# Altium PCB PCB1.PcbDoc
Units mm, origin at the board's own origin, x right, y up, seen from the top; angles counter-clockwise.
Board outline 24 x 24.06 mm, 2 copper layers (Top Layer, Bottom Layer); 36 components, 33 nets, 153 pads, 41 vias.
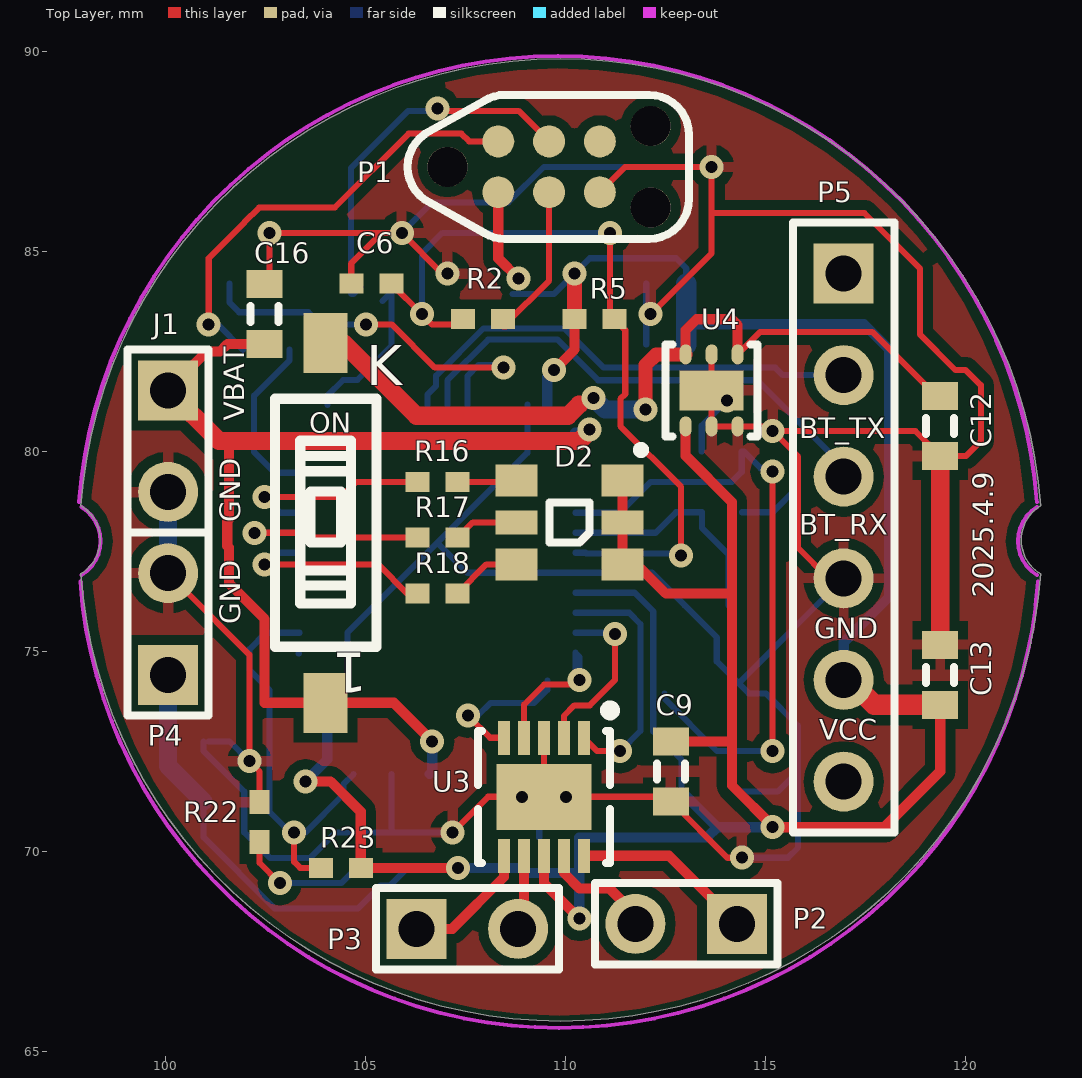
[diagram p0: Top Layer view]
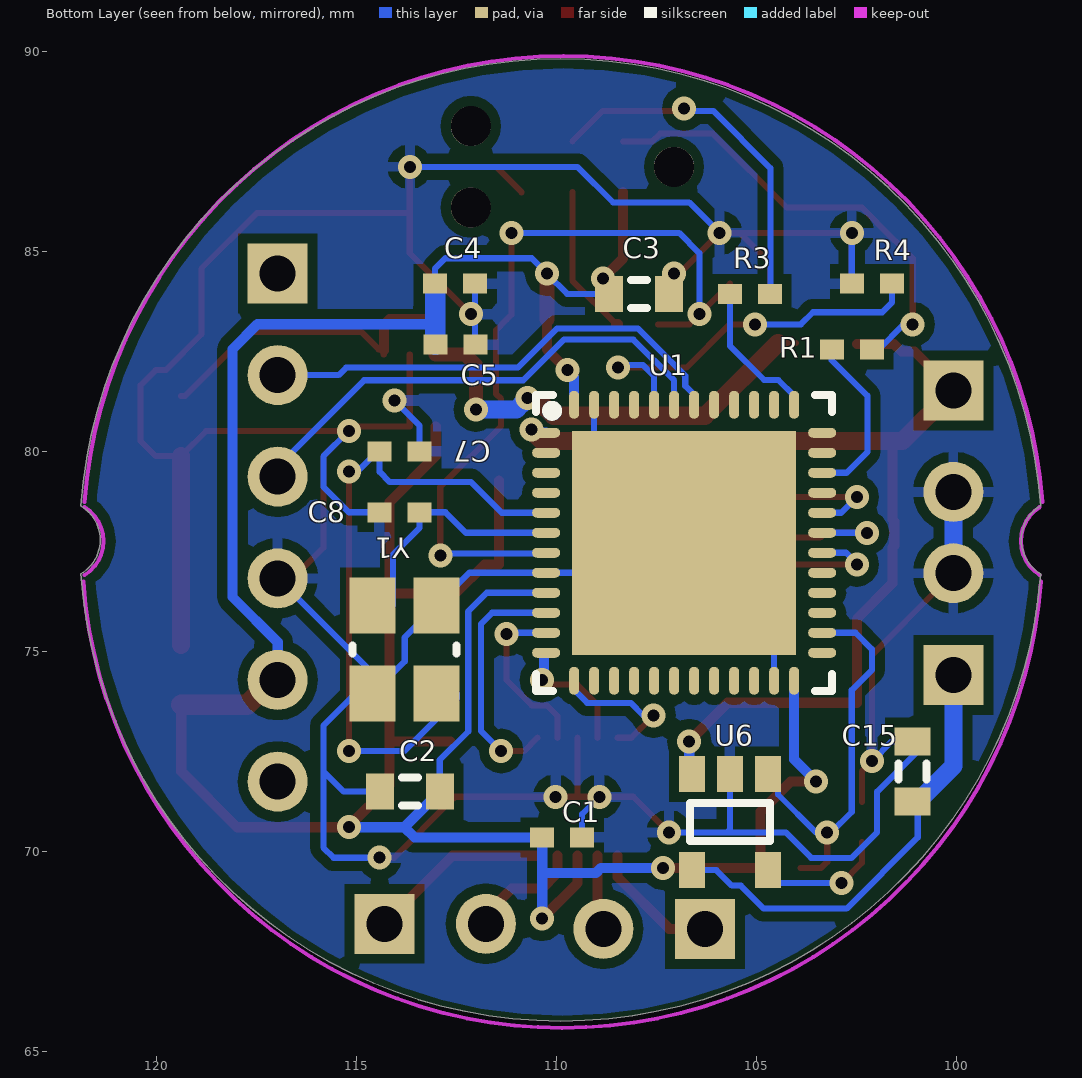
[diagram p1: Bottom Layer view, seen from below]

## Layer stack, top to bottom
Top Solder: solder mask 0.0102, Solder Resist, Dk 3.5
Top Layer: signal copper 0.0356
Dielectric 1: dielectric 0.32, FR-4, Dk 4.8
Bottom Layer: signal copper 0.0356
Bottom Solder: solder mask 0.0102, Solder Resist, Dk 3.5

## Board outline
97.893,76.946 ccw(c97.392,77.796) 97.894,78.646 cw(c109.892,77.796) 121.89,78.648 121.891,78.646 ccw(c122.392,77.796) 121.89,76.946 cw(c109.892,77.796)

## Design rules (kind name [scope] priority, off if disabled: settings)
Clearance [All] p1: gap=0.254 except(0.127: Arc-Arc Track-SMDPad Arc-Track Arc-SMDPad Track-Track SMDPad-SMDPad)
PolygonConnect [All] p1: connectstyle=Relief reliefconductorwidth=0.254 reliefentries=4 polygonreliefangle="90 Angle" airgapwidth=0.254
RoutingVias [All] p1: holewidth=0.711 width=1.27 viastyle="Through Hole" minholewidth=0.711 minwidth=1.27 maxholewidth=0.711 maxwidth=1.27
SolderMaskExpansion [All] p1: expansion=0.102
UnpouredPolygon [All] p1: allowunpoured=FALSE
Width [All] p1: maxlimit=0.254 minlimit=0.127 preferedwidth=0.152 minimp=50.000000 maximp=50.000000 favimp=50.000000
29 further rules are at their usual default settings.

## Classes and differential pairs
net class MOTOR_CONTROL[1..4]: MOTOR_CONTROL1 MOTOR_CONTROL2 MOTOR_CONTROL3 MOTOR_CONTROL4
net class RGBLED[1..3]: RGBLED1 RGBLED2 RGBLED3

## Components (designator, comment, footprint, x,y, rotation, side; value= is the part's Value field where it differs from the comment)
C1 "10nF" 0402 109.855,70.358 r0 bottom
C2 "1uF" 0603 113.665,71.502 r180 bottom
C3 "4.7uF" 0603 107.938,83.947 r0 bottom
C4 "100nF" 0402 112.53,84.201 r0 bottom
C5 "100nF" 0402 112.522,82.677 r0 bottom
C6 "100nF" 0402 105.156,84.201 r0 top
C7 "22pF" 0402 113.919,80.01 r0 bottom
C8 "22pF" 0402 113.927,78.486 r180 bottom
C9 "10uF" 0603 112.649,72.009 r90 top
C12 "1uF" 0603 119.38,80.645 r90 top
C13 "1uF" 0603 119.38,74.422 r270 top
C15 "4.7uF" 0603 101.092,72.009 r270 bottom
C16 "4.7uF" 0603 102.489,83.439 r270 top
D2 "SMLVN6RGB1W1" "3.5x2.8 mm 6-SMD" 110.109,78.232 r180 top
J1 "78171-0002" HDR1*2 100.076,80.264 r0 top
K "2.54-1P-PGT" SW-SMD_2P-L6.2-LS9.4 104.013,78.359 r90 top
P1 "TC2030-IDC-NL" TC2030-IDC-NL 109.601,87.122 r0 top
P2 "HEADER 2X1 0.05\" UNPOLARIZED" HDR1*2 113.03,68.199 r270 top
P3 "HEADER 2X1 0.05\" UNPOLARIZED" HDR1*2 107.557,68.072 r90 top
P4 "CHARGING PAD" HDR1*2 100.076,75.692 r180 top
P5 "Header 6" HDR1X6 116.967,84.455 r270 top
R1 "22R" 0402 102.616,82.55 r180 bottom
R2 "22R" 0402 107.95,83.312 r0 top
R3 "22R" 0402 105.164,83.947 r180 bottom
R4 "100K" 0402 102.108,84.201 r180 bottom
R5 "100K" 0402 110.736,83.312 r180 top
R16 "22.6R" 0402 106.807,79.248 r0 top
R17 "130R" 0402 106.807,77.851 r0 top
R18 "24.9R" 0402 106.807,76.454 r0 top
R22 "10K" 0402 102.362,70.739 r90 top
R23 "100K" 0402 104.394,69.596 r0 top
U1 "STM32F051C8U6" QFN50P700X700X60_HS-49L 106.807,77.724 r180 bottom
U3 "A3901SEJTR-T" DFN50P300X300X75_HS-11N 109.474,71.374 r180 top
U4 "ADP122ACPZ-3.3-R7" "LFCSP-6 2.0X2.0X0.55" 113.665,81.534 r0 top
U6 "MCP73831T-2ACI/OT" SOT-23-OT5_L 105.664,70.739 r270 bottom
Y1 "7V-16.000MAAE-T" "3.2x2.5 CRYSTAL" 113.792,75.057 r90 bottom

## Footprints (in the part's own frame and the unit in brackets; to place one, negate y for a bottom-side part, rotate by r counter-clockwise, add the part's x,y. Pads: shape width x height; smd on the part's side, far side on the other; paste and mask are expansions set on the pad)
"3.2x2.5 CRYSTAL" [mm]
  rect 1.4x1.15 smd: 1(-1.1,-0.8) 2(1.1,-0.8) 3(1.1,0.8) 4(-1.1,0.8)
  silkscreen extent -0.1,-1.3 0.1,1.3, body extent -1.6,-1.25 1.6,1.25, height 0.8
"3.5x2.8 mm 6-SMD" [mm] "3.5 x 2.8 mm 6-SMD Flat Leads"
  rect 1.05x0.8 smd: 1(-1.325,1.05) 3(-1.325,-1.05) 4(1.325,-1.05) 6(1.325,1.05)
  rect 1.05x0.6 smd: 2(-1.325,0) 5(1.325,0)
  silkscreen extent -0.5,-0.5 0.5,0.5, body extent -1.75,-1.4 1.75,1.4, height 0.6
0402 [mm] "Chip Body 1.0 x 0.5 mm (LxW typ)"
  rect 0.6x0.5 smd: 1(-0.5,0) 2(0.5,0)
  body extent -0.55,-0.3 0.55,0.3, height 0.55
0603 [mm] "Chip Body 1.6 x 0.8 mm (LxW typ)"
  rect 0.7x0.9 smd: 1(-0.75,0) 2(0.75,0)
  silkscreen extent -0.2,-0.35 0.2,0.35, body extent -0.85,-0.48 0.85,0.48, height 0.9
DFN50P300X300X75_HS-11N [mm]
  rect 0.3x0.85 smd: 1(-1,-1.475) 2(-0.5,-1.475) 3(0,-1.475) 4(0.5,-1.475) 5(1,-1.475) 6(1,1.475) 7(0.5,1.475) 8(0,1.475) 9(-0.5,1.475) 10(-1,1.475)
  rect 2.38x1.65 smd: 11(0,0)
  silkscreen extent -1.78,-2.28 1.65,1.65, body extent -1.5,-1.5 1.5,1.5, height 0.75
HDR1*2 [mm]
  rect 1.5x1.5 hole 0.9: 1(0,1.27)
  round 1.5 hole 0.9: 2(0,-1.27)
  silkscreen extent -1.02,-2.29 1.02,2.29
HDR1X6 [mm] "Connector; Header; 6 Position"
  rect 1.5x1.5 hole 0.9: 1(0,0)
  round 1.5 hole 0.9: 2(2.54,0) 3(5.08,0) 4(7.62,0) 5(10.16,0) 6(12.7,0)
  silkscreen extent -1.27,-1.27 13.97,1.27
"LFCSP-6 2.0X2.0X0.55" [mm] ". 6-Lead Lead Frame Chip Scale Package [LFCSP_UD]  2.00 mm?2.00 mm Body, Ultra Thin, Dual Lead  (CP-6-3)"
  oval 0.3x0.5 smd: 1(-0.65,-0.9) 2(0,-0.9) 3(0.65,-0.9) 4(0.65,0.9) 5(0,0.9) 6(-0.65,0.9)
  rect 1.6x1 smd: 7(0,0)
  silkscreen extent -1.86,-1.59 1.15,1.15, body extent -1,-1 1,1, height 0.6
QFN50P700X700X60_HS-49L [mm] "QFN, 48-Leads, Body 7,00x7,00mm, Pitch 0,50mm, Thermal Pad 5,60x5,60mm, IPC High Density"
  oval 0.7x0.25 smd: 1(-3.45,2.75) 2(-3.45,2.25) 3(-3.45,1.75) 4(-3.45,1.25) 5(-3.45,0.75) 6(-3.45,0.25) 7(-3.45,-0.25) 8(-3.45,-0.75) 9(-3.45,-1.25) 10(-3.45,-1.75) 11(-3.45,-2.25) 12(-3.45,-2.75) 25(3.45,-2.75) 26(3.45,-2.25) 27(3.45,-1.75) 28(3.45,-1.25) 29(3.45,-0.75) 30(3.45,-0.25) 31(3.45,0.25) 32(3.45,0.75) 33(3.45,1.25) 34(3.45,1.75) 35(3.45,2.25) 36(3.45,2.75)
  oval 0.25x0.7 smd: 13(-2.75,-3.45) 14(-2.25,-3.45) 15(-1.75,-3.45) 16(-1.25,-3.45) 17(-0.75,-3.45) 18(-0.25,-3.45) 19(0.25,-3.45) 20(0.75,-3.45) 21(1.25,-3.45) 22(1.75,-3.45) 23(2.25,-3.45) 24(2.75,-3.45) 37(2.75,3.45) 38(2.25,3.45) 39(1.75,3.45) 40(1.25,3.45) 41(0.75,3.45) 42(0.25,3.45) 43(-0.25,3.45) 44(-0.75,3.45) 45(-1.25,3.45) 46(-1.75,3.45) 47(-2.25,3.45) 48(-2.75,3.45)
  rect 5.6x5.6 smd: 49(0,0)
  silkscreen extent -3.7,-3.7 3.7,3.7, body extent -3.55,-3.55 3.55,3.55, height 0.6
SOT-23-OT5_L [mm] "SOT23, 5-Leads, Body 2.9x1.6mm, Pitch 0.95mm, Lead Span 2.7mm, IPC High Density"
  rect 0.9x0.65 smd: 1(-1.2,0.95) 2(-1.2,0) 3(-1.2,-0.95) 4(1.2,-0.95) 5(1.2,0.95)
  silkscreen extent -0.48,-1 0.48,1, body extent -0.9,-1.55 0.9,1.55, height 1.45
SW-SMD_2P-L6.2-LS9.4 [mm]
  rect 1.5x1.1 smd paste+0 mask+0.051: 1(-4.636,-0.002) 2(4.364,-0.002)
  silkscreen extent -3.24,-1.27 2.96,1.27
TC2030-IDC-NL [mm] "TagConnector TC2030-IDC-NL"
  round 0.8 smd paste-1: 1(-1.27,-0.635) 2(-1.27,0.635) 3(0,-0.635) 4(0,0.635) 5(1.27,-0.635) 6(1.27,0.635)
  round 1 hole 1 unplated mask+0: ""(-2.54,0) ""(2.54,-1.016) ""(2.54,1.016)
  Top Layer pour cut-out: -1.27,-0.085 -1.27,0.085 -1.06,0.127 -0.881,0.246 -0.762,0.425 -0.72,0.635 -0.72,0.635 -0.55,0.635 -0.496,0.396 -0.343,0.205 -0.122,0.099 0.122,0.099 0.343,0.205 0.496,0.396 0.55,0.635 0.55,0.635 0.72,0.635 0.762,0.425 0.881,0.246 1.06,0.127 1.27,0.085 1.27,0.085 1.27,-0.085 1.06,-0.127 0.881,-0.246 0.762,-0.425 0.72,-0.635 0.72,-0.635 0.55,-0.635 0.496,-0.396 0.343,-0.205 0.122,-0.099 -0.122,-0.099 -0.343,-0.205 -0.496,-0.396 -0.55,-0.635 -0.55,-0.635 -0.72,-0.635 -0.762,-0.425 -0.881,-0.246 -1.06,-0.127 -1.27,-0.085
  silkscreen extent -3.54,-1.8 3.5,1.8, body extent -1.67,-1.03 1.67,1.03, height 0

## Part data
C1: "10nF 0402 X7R 25V ±5%"
C2 C12 C13: "1uF 0603 X5R 10V ±10%"
C3 C15 C16: "4.7uF 0603 X5R 10V ±10%"
C4 C5 C6: "100nF 0402 X7R 16V ±10%"
C7 C8: "22pF 0402 NP0/CG0 50V ±5%"
C9: "10uF 0603 X5R 6.3V ±20%"
D2: "ROHM SMLVN6RGB1W1 LED Tri-Color Blue/Green/Red Chip LED 6-Pin 1411 T/RLED Tri-Color Blue/Green/Red Chip LED 6-Pin 1411"
J1: "Molex Pico-EZmate? Wire-to-Board Header, 2 contacts"
P1: "TagConnect TC2030-IDC-NL SWD Programming Connector"
P5: "Header, 6-Pin"
R1 R2 R3: "22R 0402 1/16W ±1%"
R4 R5 R23: "100K 0402 1/16W ±1%"
R16: "22.6R 0402 1/16W ±0.05R"
R17: "130R 0402 1/16W ±0.05R"
R18: "24.9R 0402 1/16W ±0.05R"
R22: "10K 0402 1/16W ±1%"
U1: "STMICROELECTRONICS  STM32F051C8U6  MCU 32BIT CORTEX-M0 48MHZ UFQFPN-48"
U3: "ALLEGRO MICROSYSTEMS - A3901SEJTR-T - IC, MOTOR DRIVER"
U4: "Analog Devices ADP122ACPZ-3.3-R7 - 5.5 V Input, 300 mA, Low Quiescent  Current, CMOS Linear Regulator"
U6: "Miniature Single-Cell, Fully Integrated Li-Ion, Li-Polymer Charge Management Controller, 4.2V, 5-Pin SOT-23, Industrial Temperature, Tape and Reel"
Y1: "TXC - 7V-16.000MAAE-T, 16MHZ, 30PPM, 12PF - CRYSTAL"

## Via types
v1: diameter 0.6, hole 0.3, Top Layer to Bottom Layer, 41 vias

## Nets (pads, with @x,y where several pads share a name; then routed paths per layer and width w, separated by ;. In a path a pad name is that pad's centre, name@x,y a point inside that pad or via, vN(x,y) a via of type N, cw(c..) or ccw(c..) an arc to the next point about the centre after c; other vN are vias at no path point)
+3.3V: C1.2 C2.2 C3.2 C4.2 C5.2 C9.2 C13.2 D2.1 D2.2 D2.3 P1.1 P5.5 R5.2 R23.2 U1.9 U1.24 U1.48 U3.8 U4.1 | length 81.6
  Top Layer w0.152: P5.5 P5.5@117.105,74.295
  Top Layer w0.254: v1(103.513,71.756) 104.139,71.756 104.894,71.001 R23.2 v1(107.33,69.597) ; P1.1 108.331,84.836 v1(108.838,84.329) ; U3.8 109.474,69.215 v1(110.363,68.326) ; v1(109.727,82.043) 110.236,82.552 R5.2 ; D2.3 D2.2 D2.1 111.794,77.182 112.522,76.454 114.173,76.454 ; C9.2 114.161,72.759 114.173,72.771 ; U4.1 113.015,79.898 114.173,78.74 114.173,76.454 ; v1(115.188,70.613) v1@115.214,70.613 ; C13.2 119.38,72.009 117.984,70.613 v1@115.214,70.613 ; 114.173,72.771 114.173,76.454 ; 114.173,72.771 114.173,71.654 v1@115.214,70.613
  Top Layer w0.381: R5.2 v1(110.236,84.455)
  Top Layer w0.508: P5.5@117.105,74.295 117.728,73.672 C13.2
  Bottom Layer w0.152: C3.2 109.728,83.947 v1(110.236,84.455) 110.617,84.836 112.776,84.836 113.03,84.582 C4.2 ; U1.9 111.74,76.474 112.205,76.009 112.205,73.006 112.915,72.295 C2.2@112.915,71.601
  Bottom Layer w0.254: v1@103.505,71.755 104.057,72.307 U1.24 ; v1(107.33,69.597) 108.802,69.597 108.803,69.596 108.883,69.596 109.007,69.472 110.355,69.472 ; U1.48 109.557,81.871 v1@109.601,81.915 ; v1@110.355,68.334 110.355,69.472 ; C2.2 113.803,70.613 ; 113.03,83.185 117.475,83.185 118.098,82.562 118.098,76.367 116.967,75.236 P5.5 ; v1(115.188,70.613) 113.803,70.613 ; 110.355,69.472 C1.2 113.548,70.358 113.803,70.613
  Bottom Layer w0.508: C5.2@113.03,82.677 113.03,83.185 C4.2
BT_RX: P5.3 U1.43 | length 12.5
  Bottom Layer w0.152: U1.43 107.057,81.784 108.077,82.804 109.813,82.804 110.829,81.788 114.808,81.788 116.967,79.629 P5.3
BT_TX: P5.2 U1.42 | length 12
  Bottom Layer w0.152: U1.42 106.557,81.425 106.778,81.646 106.778,81.9 107.961,83.083 109.982,83.083 110.964,82.102 115.256,82.102 115.443,81.915 P5.2
CHARGING: R23.1 U1.26 U6.1 | length 10.2
  Top Layer w0.152: v1(103.229,70.486) 103.229,69.747 103.38,69.596 R23.1
  Bottom Layer w0.152: U1.26 102.523,75.474 102.113,75.064 102.113,74.542 102.482,74.173 102.484,74.173 102.616,74.041 102.616,70.993 103.124,70.485 103.514,70.485 104.46,71.431 104.46,71.685 U6.1
GND: C1.1 C2.1 C3.1 C4.1 C5.1 C6.1 C7.1 C8.1 C9.1 C12.1 C13.1 C15.1 C16.1 J1.2 P1.5 P4.2 P5.4 R4.1 R22.2 U1.8 U1.23 U1.47 U1.49 U3.3 U3.11 U4.2 U4.3 U4.5 U4.7 U6.2 Y1.2 Y1.4 | length 121.3
  Top Layer w0.152: P4.2@100.076,76.581 100.457,76.581 102.108,74.93 v1(102.108,72.263) 102.362,72.009 R22.2 ; C16.1 102.616,84.316 v1(102.616,85.471) 105.418,85.471 ; C6.1 104.656,84.709 105.418,85.471 ; v1(107.061,84.455) 106.934,84.455 v1(105.918,85.471) 105.418,85.471 ; v1(107.188,70.485) 108.077,71.374 v1(108.924,71.374) U3.11 ; U3.3 U3.11 ; P1.5 111.506,87.122 v1(113.665,87.122) 113.665,85.979 ; v1(112.141,83.439) 113.665,84.963 113.665,85.979 ; U4.5 U4.7 U4.2 U4.3 115.073,80.634 v1(115.189,80.518) ; v1(114.419,69.85) 114.058,69.85 C9.1 112.534,71.374 v1(110.024,71.374) U3.11 ; P5.4 116.586,76.835 115.824,77.597 115.824,79.883 v1(115.189,80.518) ; 113.665,85.979 113.677,85.967 117.487,85.967 118.872,84.582 118.872,82.932 119.762,82.042 120.015,82.042 120.396,81.661 120.396,80.264 120.027,79.895 C12.1 118.757,80.518 v1(115.189,80.518)
  Top Layer w0.452: C13.1 C12.1
  Bottom Layer w0.152: C15.1@100.965,72.759 100.965,72.517 101.981,71.501 101.981,70.485 102.62,69.846 103.628,69.846 104.267,70.485 105.728,70.485 ; C15.1 101.612,72.759 v1(102.108,72.263) ; R4.1@102.616,84.209 v1(102.616,85.471) ; U1.23 104.557,75.474 U1.49 ; U6.2 105.664,70.549 105.728,70.485 ; v1(105.918,85.471) 106.68,86.233 108.585,86.233 109.474,87.122 v1(113.665,87.122) ; v1(107.188,70.485) 105.728,70.485 ; v1(108.924,71.374) 109.355,70.943 C1.1 ; U1.47 109.057,79.974 U1.49 ; C5.1@112.03,82.677 C4.1 ; C7.1 113.419,80.653 v1(114.046,81.28) ; C2.1 115.316,71.501 115.824,72.009 ; v1(114.419,69.85) 115.57,69.85 115.824,70.104 115.824,72.009 ; C8.1 115.189,78.486 115.824,79.121 115.824,79.883 v1(115.189,80.518) ; P5.4 116.962,76.835 Y1.4@114.338,74.211 ; U1.49 107.557,76.974 U1.8 112.175,76.974 Y1.2 113.792,75.357 113.792,74.757 Y1.4@114.338,74.211 ; Y1.4@114.338,74.211 Y1.4 115.019,73.957 115.824,73.152 115.824,72.009
  Bottom Layer w0.452: P4.2@100.076,76.581 J1.2
IMU_INT: U1.25 | length 0
  Bottom Layer w0.152: U1.25@103.338,74.955 U1.25@103.342,74.959
MCU_X1_16MHZ: C7.2 U1.5 Y1.1 | length 16.4
  Top Layer w0.152: v1(115.189,72.517) v1(115.189,79.502)
  Bottom Layer w0.152: U1.5 111.367,78.474 112.141,79.248 114.173,79.248 114.419,79.494 C7.2 114.469,80.01 114.891,79.588 115.103,79.588 v1(115.189,79.502) ; Y1.1@112.484,73.957 112.484,73.832 113.799,72.517 v1(115.189,72.517)
MCU_X2_16MHZ: C8.2 U1.6 Y1.3 | length 6
  Bottom Layer w0.152: U1.6 112.264,77.974 112.776,78.486 C8.2 113.427,78.089 114.084,77.432 Y1.3@114.084,76.157
MOTOR_CONTROL1: U1.10 U3.1 | length 6.2
  Top Layer w0.152: U3.1 110.806,72.517 v1(111.379,72.517)
  Bottom Layer w0.152: U1.10 111.605,75.974 111.887,75.692 111.887,73.025 v1(111.379,72.517)
MOTOR_CONTROL2: U1.11 U3.2 | length 4.4
  Top Layer w0.152: U3.2 109.974,73.398 110.236,73.66 110.617,73.66 111.252,74.295 v1(111.252,75.438)
  Bottom Layer w0.152: U1.11 111.216,75.474 v1(111.252,75.438)
MOTOR_CONTROL3: U1.12 U3.4 | length 3.9
  Top Layer w0.152: U3.4 108.974,73.676 109.474,74.176 110.244,74.176 v1(110.363,74.295)
  Bottom Layer w0.152: v1@110.257,74.295 U1.12 110.363,74.868 v1(110.363,74.295)
MOTOR_CONTROL4: U1.13 U3.5 | length 3.6
  Top Layer w0.152: v1(107.569,73.406) 108.126,72.849 U3.5
  Bottom Layer w0.152: v1(107.569,73.406) 107.823,73.406 108.138,73.721 109.229,73.721 109.557,74.049 U1.13
NetC12_2: C12.2 K.2 U4.4 U4.6 | length 19.9
  Top Layer w0.152: K.2 K.2@104.463,82.723 ; 110.356,81.18 110.644,81.18 v1@110.744,81.28 ; U4.6 U4.6@113.015,82.471 ; U4.4 U4.4@114.315,82.534 ; U4.4@114.383,82.562 114.443,82.562 114.876,82.995 117.68,82.995 119.28,81.395 C12.2
  Top Layer w0.252: U4.6@113.015,82.471 113.015,83.043 113.284,83.312 114.173,83.312 114.315,83.17 U4.4@114.315,82.534
  Top Layer w0.354: v1(112.014,81.058) 112.014,82.169 112.279,82.434 U4.6
  Top Layer w0.452: K.2@104.463,82.723 106.287,80.899 110.075,80.899 110.356,81.18
  Bottom Layer w0.152: v1@110.744,81.28 110.844,81.18 v1@110.878,81.18
  Bottom Layer w0.452: v1@110.878,81.18 111,81.058 v1(112.014,81.058)
  other v1: 110.717,81.339
NetC15_2: C15.2 P4.1 U6.4 | length 11.2
  Bottom Layer w0.152: C15.2@100.965,71.259 100.965,70.358 102.743,68.58 104.817,68.58 105.39,69.152 105.613,69.152 106,69.539 U6.4
  Bottom Layer w0.452: P4.1 100.076,72.148 C15.2@100.965,71.259
NetD2_4: D2.4 R16.2 | length 1.5
  Top Layer w0.152: R16.2 108.75,79.248 D2.4
NetD2_5: D2.5 R17.2 | length 1.6
  Top Layer w0.152: R17.2 107.315,77.851 107.696,78.232 D2.5
NetD2_6: D2.6 R18.2 | length 1.8
  Top Layer w0.152: R18.2 108.035,77.182 D2.6
NetP1_2: P1.2 R1.2 | length 11.4
  Top Layer w0.152: v1(101.092,83.185) 101.092,84.836 101.986,85.73 101.986,85.732 102.355,86.101 102.357,86.101 102.362,86.106 104.244,86.106 106.09,87.952 107.405,87.952 107.6,87.757 P1.2
  Bottom Layer w0.152: v1(101.092,83.185) 101.313,83.185 R1.2@101.948,82.55
NetP1_3: P1.3 R2.2 | length 3.8
  Top Layer w0.152: R2.2@108.508,83.185 109.601,84.278 P1.3
  Top Layer w0.254: R2.2@108.458,83.185 R2.2@108.508,83.185
NetP1_4: P1.4 R3.2 | length 9.4
  Top Layer w0.152: v1(106.807,88.582) 106.87,88.519 108.839,88.519 P1.4
  Bottom Layer w0.152: R3.2@104.888,84.121 104.714,83.947 R3.2 104.648,83.963 104.648,87.09 106.077,88.519 106.744,88.519 v1(106.807,88.582)
NetP2_1: P2.1 U3.10 | length 4.5
  Top Layer w0.252: U3.10 112.6,69.899 P2.1
NetP2_2: P2.2 U3.9 | length 2.9
  Top Layer w0.252: U3.9 109.974,69.466 110.363,69.077 111.12,69.077 111.76,68.437 P2.2
NetP3_1: P3.1 U3.6 | length 3.3
  Top Layer w0.252: P3.1 107.18,68.072 108.474,69.366 U3.6
NetP3_2: P3.2 U3.7 | length 1.9
  Top Layer w0.152: P3.2 P3.2@108.974,68.219
  Top Layer w0.252: P3.2@108.974,68.219 U3.7
NetR4_2: R4.2 U1.44 | length 9.8
  Top Layer w0.152: v1(105.029,83.185) 105.664,83.185 106.747,82.102 v1(108.458,82.102)
  Bottom Layer w0.152: R4.2 101.608,83.732 101.854,83.486 103.585,83.486 103.886,83.185 v1(105.029,83.185) ; U1.44 107.557,81.889 107.837,82.169 108.391,82.169 v1(108.458,82.102)
NetR22_1: R22.1 U6.5 | length 3.6
  Top Layer w0.152: R22.1 102.362,69.723 v1(102.869,69.216) v1@102.997,69.088
  Bottom Layer w0.152: v1@102.997,69.088 v1(102.869,69.216) 104.409,69.216 U6.5@104.723,69.53
NRST: C6.2 R2.1 R5.1 U1.7 | length 20.1
  Top Layer w0.152: C6.2 106.426,83.431 106.672,83.185 R2.1@107.458,83.185 ; v1(111.124,85.472) 111.124,83.424 R5.1 111.506,83.042 111.506,81.441 111.384,81.319 111.384,80.64 112.903,79.121 v1(112.903,77.411)
  Bottom Layer w0.152: v1(106.426,83.439) 106.426,84.961 106.425,84.962 106.934,85.471 v1@110.998,85.471 ; U1.7 110.508,77.474 110.527,77.455 112.859,77.455 v1(112.903,77.411)
RGBLED1: R17.1 U1.31 | length 5
  Top Layer w0.152: v1(102.235,77.974) 103.282,77.974 103.405,77.851 R17.1@106.053,77.851
  Bottom Layer w0.152: v1(102.235,77.974) U1.31
RGBLED2: R16.1 U1.32 | length 4.8
  Top Layer w0.152: v1(102.489,78.867) 104.394,78.867 104.775,79.248 R16.1@106.053,79.248
  Bottom Layer w0.152: v1(102.489,78.867) 102.882,78.474 U1.32
RGBLED3: R18.1 U1.30 | length 4.7
  Top Layer w0.152: v1(102.489,77.182) 105.325,77.182 R18.1@106.053,76.454
  Bottom Layer w0.152: v1@102.624,77.343 102.755,77.474 U1.30
SWCLK: R3.1 U1.37 | length 3.9
  Bottom Layer w0.152: U1.37 104.057,81.399 104.451,81.793 104.808,81.793 105.664,82.649 R3.1 105.614,83.947 R3.1@105.44,83.773
SWDIO: R1.1 U1.34 | length 4.3
  Bottom Layer w0.152: R1.1 103.116,82.288 102.227,81.399 102.227,79.99 102.743,79.474 U1.34
VBAT: C16.2 J1.1 K.1 U1.1 U6.3 | length 26.8
  Top Layer w0.254: J1.1 101.046,82.504 101.374,82.504 101.559,82.689 C16.2 ; 101.6,80.264 101.6,78.302 101.554,78.256 101.554,77.646 101.6,77.6 101.6,76.708 102.489,75.819 102.489,73.723 K.1 105.716,73.723 v1(106.68,72.759)
  Top Layer w0.454: J1.1 101.346,80.264 101.6,80.264 110.363,80.264 v1@110.617,80.518
  Bottom Layer w0.254: U6.3 106.68,72.005 v1(106.68,72.759) ; U1.1 110.541,80.474 v1(110.617,80.55)
pads on no net: P1. P1.6 P5.1 P5.6 U1.2 U1.3 U1.4 U1.14 U1.15 U1.16 U1.17 U1.18 U1.19 U1.20 U1.21 U1.22 U1.27 U1.28 U1.29 U1.33 U1.35 U1.36 U1.38 U1.39 U1.40 U1.41 U1.45 U1.46

## Polygon pours and split planes (outlines as drawn)
GND on Bottom Layer "Bottom Layer-No Net" (solid, remove dead copper, pour order 4): 97.79,90.17 121.92,90.17 121.92,65.659 121.793,65.532 97.79,65.532 97.79,90.17
GND on Top Layer "Bottom Layer-No Net" (solid, remove dead copper, pour order 6): 97.79,90.17 121.92,90.17 121.92,65.405 97.79,65.405 97.79,90.17

## Keep-outs
Keep-Out Layer:
  lines w0.1: 97.853,78.74 cw(c109.823,77.892) 121.793,78.74 ; 97.885,76.749 ccw(c109.855,77.597) 121.825,76.749 ; 97.917,76.917 ccw(c97.387,77.765) 97.917,78.613 ; 121.793,76.917 cw(c122.323,77.765) 121.793,78.613

## Silkscreen, mask and mechanical layers (free items; w line width, h text height)
Top Overlay:
  text "VBAT" at 101.981,80.772 h0.51 r90
  text "BT_TX" at 115.849,80.332 h0.51
  text "GND" at 101.884,78.232 h0.51 r90
  text "BT_RX" at 115.849,77.919 h0.51
  text "2025.4.9" at 120.709,76.352 h0.51 r90
  text "GND" at 101.884,75.692 h0.51 r90
  text "GND" at 116.23,75.336 h0.51
  text "VCC" at 116.357,72.796 h0.51
Mechanical 2:
  lines w0.254: 97.893,76.946 ccw(c97.392,77.796) 97.894,78.646 cw(c109.892,77.796) 121.89,78.648 ; 97.894,76.944 ccw(c109.892,77.796) 121.89,76.946 cw(c122.392,77.796) 121.891,78.646
Mechanical 10:
  lines w0.1: 97.885,78.699 cw(c109.855,77.851) 121.825,78.699 ; 97.855,76.943 ccw(c109.825,77.791) 121.795,76.943 ; 97.855,76.943 ccw(c97.325,77.791) 97.855,78.639 ; 97.855,76.943 ccw(c97.325,77.791) 97.855,78.639 ; 97.855,76.943 ccw(c109.825,77.791) 121.795,76.943 ; 97.855,78.639 cw(c109.825,77.791) 121.795,78.639 ; 97.855,78.639 cw(c109.825,77.791) 121.795,78.639 ; 97.982,76.943 ccw(c97.452,77.791) 97.982,78.639 ; 97.982,76.943 ccw(c109.952,77.791) 121.922,76.943 ; 97.982,76.943 ccw(c109.952,77.791) 121.922,76.943 ; 97.982,76.943 ccw(c97.452,77.791) 97.982,78.639 ; 97.982,78.639 cw(c109.952,77.791) 121.922,78.639 ; 97.982,78.639 cw(c109.952,77.791) 121.922,78.639 ; 121.795,76.943 cw(c122.325,77.791) 121.795,78.639 ; 121.795,76.943 cw(c122.325,77.791) 121.795,78.639 ; 121.922,76.943 cw(c122.452,77.791) 121.922,78.639 ; 121.922,76.943 cw(c122.452,77.791) 121.922,78.639

## Text inside footprints (layer, text, board x,y; h text height)
K: Top Overlay "1" at 105.057,74.974 h1 r180; Top Overlay "ON" at 103.605,80.473 h0.5